# Altium PCB DIO_8SMA_8MCX.PcbDoc (part 9 of 9)
Units mm, origin at the board's own origin, x right, y up, seen from the top; angles counter-clockwise.
Board outline 222.9 x 100 mm, 6 copper layers (TopLayer, L2, L3, L4, L5, Bottom Layer), stack 1.492 mm thick; 542 components, 326 nets, 1968 pads, 1583 vias.
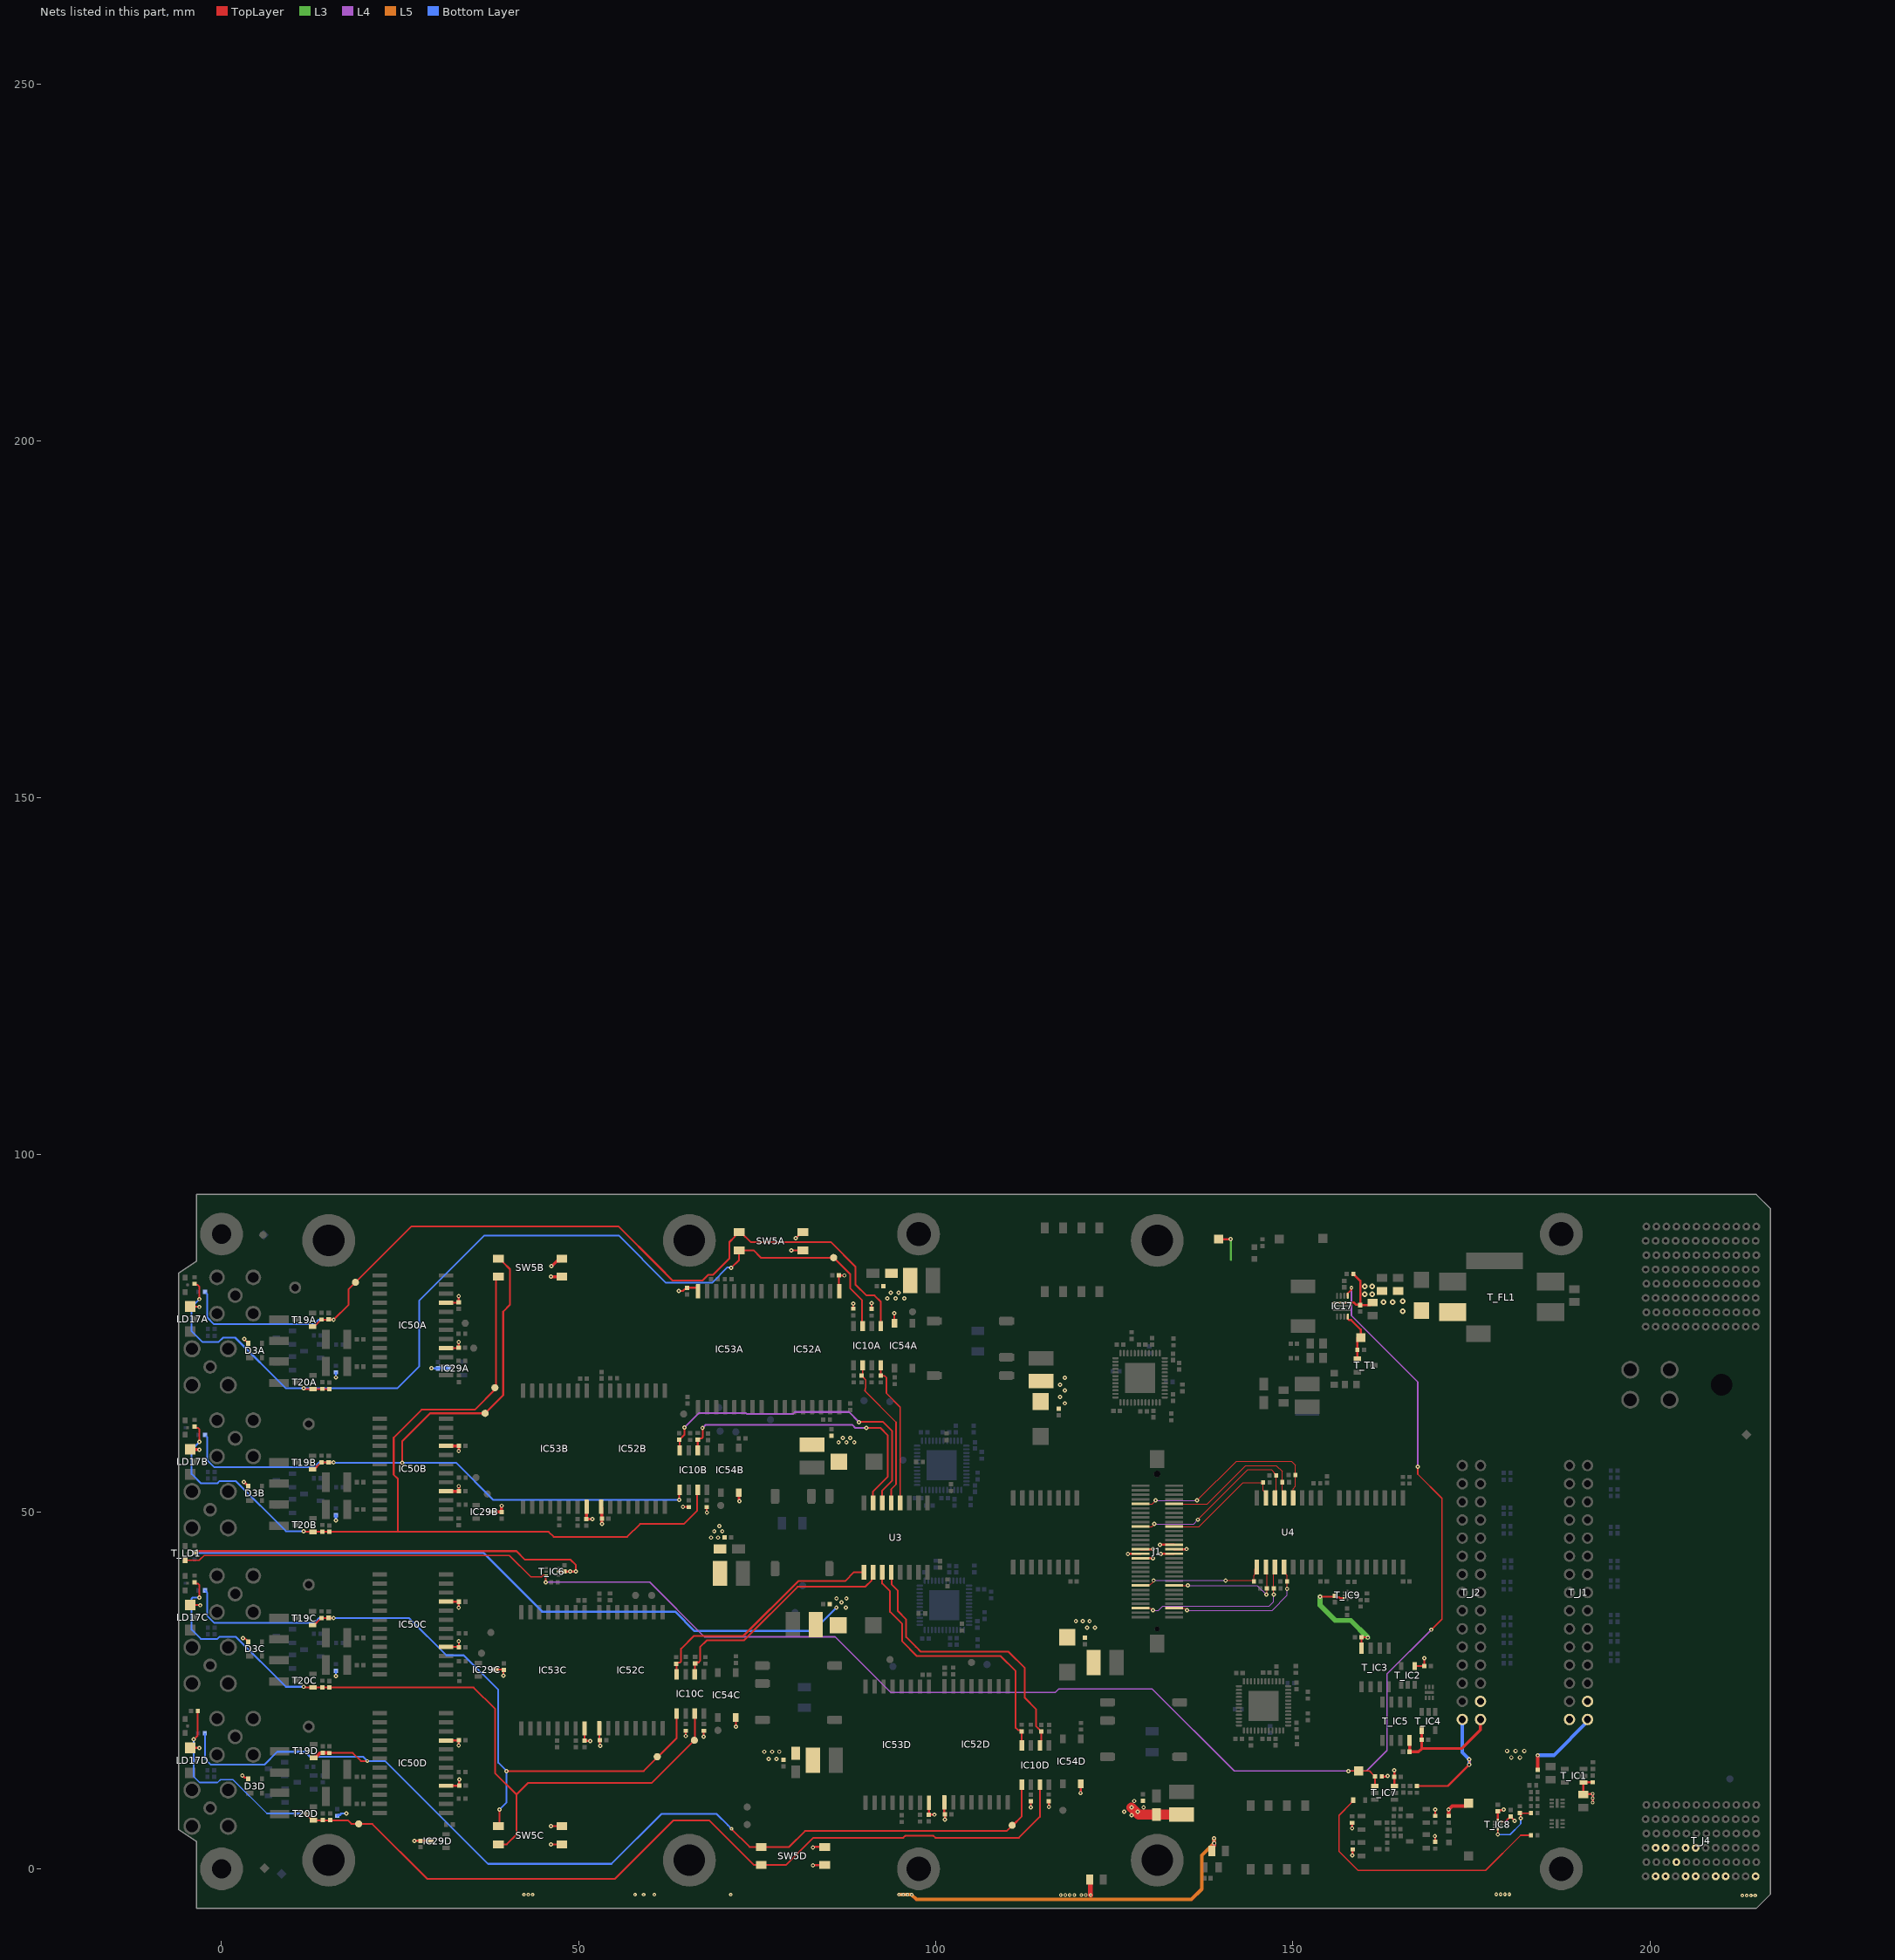
[diagram p12: the nets of this part, all layers, seen from the top]

## Via types
v1: diameter 0.6, hole 0.25, TopLayer to Bottom Layer, tented both sides, 1359 vias
v2: diameter 0.5, hole 0.2, TopLayer to Bottom Layer, tented both sides, 127 vias
v3: diameter 0.6, hole 0.3, TopLayer to Bottom Layer, tented both sides, 45 vias
v4: diameter 0.8, hole 0.3, TopLayer to Bottom Layer, tented both sides, 40 vias
v5: diameter 0.5, hole 0.25, TopLayer to Bottom Layer, tented both sides, 12 vias

## Nets (pads, with @x,y where several pads share a name; then routed paths per layer and width w, separated by ;. In a path a pad name is that pad's centre, name@x,y a point inside that pad or via, vN(x,y) a via of type N, cw(c..) or ccw(c..) an arc to the next point about the centre after c; other vN are vias at no path point) (continued)
P3V3_MP: T_C3.2 T_C4.2 T_C8.2 T_C20.2 T_C22.2 T_C23.2 T_C24.2 T_IC2.4 T_IC3.8 T_IC6.5 T_IC7.6 T_IC8.1 T_IC8.8 T_IC9.8 T_J1.30 T_R1.2 T_R2.2 T_R6.2 T_R8.2 T_R31.2 T_R32.2 T_R33.2 T_R34.2 T_TP3.1 | length 102.4
  TopLayer w0.25: T_R1.2@-3.803,44.307 -3.615,44.495 -3.474,44.495 -3.469,44.5 41.3,44.5 42.5,43.3 48.871,43.3 49.59,42.581 v1(49.59,41.636) ; v1(153.809,38.114) 153.823,38.129 155.754,38.129 T_C24.2@155.875,38.25 156.101,38.024 156.515,38.024 156.638,37.9 T_IC9.8@157.2,37.9 ; T_IC3.8@159.62,30.9 159.62,32.398 T_C4.2@159.607,32.411 160.489,32.411 v5(160.5,32.4) ; T_IC2.4@167.05,28.4 T_C3.2@168.4,28.4 v1(168.4,29.5) ; T_IC8.1@178.7,6.73 T_C22.2@178.7,8.057 178.86,8.217 179.295,8.217 179.396,8.318 v1(179.512,8.318) ; T_IC8.8@179.175,6.6 179.75,6.6 T_C23.2@180.5,7.35 180.66,7.19 180.66,7.141 v1(181.075,6.727)
  TopLayer w0.3: T_IC6.5@47.138,41.6 47.961,41.6 T_C8.2@47.998,41.636 v1(48.794,41.636) v1(49.59,41.636) ; v1(158.3,5.7) T_R34.2@158.3,6.43 ; v1(158.311,1.916) 158.355,1.961 158.355,2.685 T_R33.2@158.4,2.73 ; T_R8.2@162.449,12.923 162.451,12.925 163.144,12.925 163.219,13 v1(163.3,13) ; T_IC7.6@164.2,11.583 164.2,12.888 T_C20.2@164.198,12.89 164.198,13.798 v1(164.2,13.8) ; v1(169.9,4.6) 169.933,4.567 169.933,3.812 T_R32.2@169.955,3.79 ; T_R31.2@169.936,7.436 169.936,8.318 v1(169.942,8.324)
  TopLayer w0.5: T_R6.2@171.833,7.42 171.833,8.24 171.8,8.273 v1(171.8,8.3) 172.306,8.806 174.206,8.806 T_TP3.1@174.6,9.2 ; v1(184.284,15.907) 184.3,15.891 T_R2.2@184.3,13.87
  L3 w0.7: v1(153.809,38.114) 153.809,36.917 155.925,34.8 158.1,34.8 v5(160.5,32.4)
  Bottom Layer w0.5: v1(184.284,15.907) 186.555,15.907 191.27,20.622 T_J1.30@191.27,20.92
P3V3_MP2: T_C5.2 T_C6.2 T_IC4.4 T_IC5.8 T_J2.30 | length 16.8
  TopLayer w0.4: T_IC5.8@166.335,17.975 166.35,17.96 T_C6.2@166.35,16.4 167.6,16.4 168.049,16.849 ; T_C5.2@168.049,18.099 168.049,16.849 ; T_C5.2@168.05,18.1 T_IC4.4@168.05,19.4 ; T_J2.30@176.27,20.92 176.27,19.47 173.649,16.849 168.049,16.849
P5V0_ISO1: C32A.2 C33A.2 C42A.1 C43A.2 C56A.2 C76A.2 C88A.2 D3A.4 IC29A.3 IC50A.16 IC50A.21 IC52A.1 IC53A.16 IC54A.6 L5A.1 LD17A.1 R87A.1 R88A.1 R220A.2 SW5A.1 SW5A.2 | length 21.6
  TopLayer w0.25: LD17A.1@-4.4,78.75 -3.15,78.75 v1(-3.1,78.7) ; v1(3.2,74.2) 3.2,74.15 3.525,73.825 3.575,73.825 3.75,73.65 D3A.4@3.75,73.6 ; IC50A.16@31.45,72.94 33.14,72.94 C33A.2@33.2,73 v1(33.2,73.8) ; IC50A.21@31.45,79.29 33.226,79.29 C32A.2@33.238,79.302 ; C32A.2@33.2,79.35 v1(33.2,80.2) ; v1(63.997,80.926) 64.57,80.926 64.809,81.165 65.015,81.165 65.222,81.372 65.234,81.372 65.254,81.392 IC53A.16@66.714,81.392 ; v1(79.8,86.6) 79.83,86.63 SW5A.1@81.393,86.63 ; v1(80.399,88.319) 80.768,88.688 80.768,88.745 81.193,89.17 SW5A.2@81.393,89.17 ; IC52A.1@86.495,81.392 86.45,81.437 86.45,83.107 86.454,83.104 87.196,83.104 v1(87.2,83.1) ; v1(88.443,79.175) 88.453,79.165 88.453,78.457 R88A.1@88.462,78.448 ; v1(91,79.2) 91.017,79.183 R87A.1@91.017,78.417 ; v1(94.2,77.8) 94.211,77.789 IC54A.6@94.211,76.427
  Bottom Layer w0.25: v1(16,68.813) R220A.2@16,69.53 ; v1(29.4,70.1) 29.409,70.091 C56A.2@30.291,70.091 30.3,70.1 IC29A.3@31.55,70.1
  other v1: 93.2,79.9 94.4,79.9 95.6,79.9 93.7,80.7 94.8,80.7
P5V0_ISO2: C32B.2 C33B.2 C42B.1 C43B.2 C56B.2 C76B.2 C88B.2 D3B.4 IC29B.3 IC50B.16 IC50B.21 IC52B.1 IC53B.16 IC54B.6 L5B.1 LD17B.1 R87B.1 R88B.1 R220B.2 SW5B.1 SW5B.2 | length 20.9
  TopLayer w0.25: v1(64.6,50.7) 65.404,50.7 R87B.1@65.428,50.676 ; v1(67.956,49.916) R88B.1@67.955,50.68
  TopLayer w0.4: LD17B.1@-4.4,58.75 -4.393,58.743 -3.197,58.743 -3.154,58.7 v1(-3.1,58.7) ; v1(3.103,54.2) 3.553,53.75 3.65,53.75 3.75,53.65 D3B.4@3.75,53.6 ; IC50B.16@31.45,52.875 C33B.2@33.246,52.875 ; IC50B.21@31.45,59.225 33.219,59.225 C32B.2@33.225,59.231 ; v1(33.2,53.6) 33.225,53.575 33.225,52.896 C33B.2@33.246,52.875 ; v1(33.2,58.5) 33.225,58.525 C32B.2@33.225,59.231 ; C33B.2@33.25,52.871 C33B.2@33.246,52.875 ; C32B.2@33.25,59.256 C32B.2@33.225,59.231 ; IC29B.3@38.45,50 39.2,50 v1(39.2,50.85) ; v1(46.13,82.93) SW5B.1@47.65,82.93 ; v1(46.2,84.4) 46.92,85.12 47.3,85.12 SW5B.2@47.65,85.47 ; IC53B.16@51.113,50.707 51.113,49.027 C88B.2@51.068,48.982 51.882,48.982 v1(51.9,49) ; IC52B.1@53.155,50.708 53.222,50.641 53.222,49.061 C76B.2@53.25,49.033 53.253,49.029 53.253,48.339 v1(53.257,48.335) ; R88B.1@67.953,50.682 R88B.1@67.955,50.68 ; v1(67.956,49.916) v1(67.956,49.916) ; IC54B.6@72.439,52.68 72.439,51.615 72.5,51.554 v1(72.5,51.5)
  Bottom Layer w0.4: v1(15.996,48.804) 15.998,48.806 15.998,49.528 R220B.2@16,49.53
  other v1: 68.557,46.389 69.505,46.389 68.992,47.28 70.1,47.3 69.7,48
P5V0_ISO3: C32C.2 C33C.2 C42C.1 C43C.2 C56C.2 C76C.2 C88C.2 D3C.4 IC29C.3 IC50C.16 IC50C.21 IC52C.1 IC53C.16 IC54C.6 L5C.1 LD17C.1 R87C.1 R88C.1 R220C.2 SW5C.1 SW5C.2 | length 21.9
  TopLayer w0.25: LD17C.1@-4.4,36.95 -3.025,36.95 v1(-2.995,36.92) ; v1(3,32.31) 3.067,32.243 3.307,32.243 3.525,32.025 3.575,32.025 3.75,31.85 D3C.4@3.75,31.8 ; IC50C.16@31.45,31.075 33.212,31.075 33.258,31.029 33.258,31.842 v1(33.2,31.9) ; IC50C.21@31.45,37.425 31.461,37.414 33.204,37.414 33.204,36.604 v1(33.2,36.6) ; IC29C.3@38.55,27.9 C56C.2@39.4,27.9 ; v1(39.473,27.062) 39.487,27.075 39.487,27.837 C56C.2@39.5,27.85 ; v1(46.1,3.4) SW5C.1@47.92,3.4 ; v1(46.1,6) 46.124,5.976 SW5C.2@48.144,5.976 ; IC53C.16@50.845,19.675 50.8,19.63 C88C.2@50.8,17.95 50.825,17.925 51.575,17.925 v1(51.6,17.9) ; IC52C.1@52.881,19.688 52.881,18.108 C76C.2@52.976,18.013 52.976,17.224 v1(53,17.2) ; v1(65,18.6) R87C.1@65.001,19.336 ; v1(67.5,18.5) 67.526,18.526 R88C.1@67.526,19.343 ; v1(72,19.9) 72.002,19.902 IC54C.6@72.002,21.187
  Bottom Layer w0.25: v1(16,27) R220C.2@16,27.73
  other v1: 76.6,15.4 77.7,15.4 76,16.4 77.1,16.4 78.1,16.4
P5V0_ISO4: C32D.2 C33D.2 C42D.1 C43D.2 C56D.2 C76D.2 C88D.2 D3D.4 IC29D.3 IC50D.16 IC50D.21 IC52D.1 IC53D.16 IC54D.6 L5D.1 LD17D.1 R87D.1 R88D.1 R220D.2 SW5D.1 SW5D.2 | length 29.8
  TopLayer w0.3: LD17D.1@-4.4,16.95 -3.15,16.95 v1(-3.1,16.9) ; v1(2.903,13.063) 2.931,13.063 3.229,12.765 3.6,12.765 3.75,12.615 D3D.4@3.75,12.6 ; v1(27,3.9) 27.028,3.928 C56D.2@27.848,3.928 29.122,3.928 IC29D.3@29.15,3.9 ; IC50D.16@31.447,11.631 33.264,11.631 C33D.2@33.283,11.65 33.283,12.483 v1(33.3,12.5) ; IC50D.21@31.447,17.981 33.175,17.981 C32D.2@33.215,18.021 ; v1(33.2,17.3) 33.215,17.315 C32D.2@33.215,18.021 ; C32D.2@33.229,18.035 C32D.2@33.215,18.021 ; v1(82.8,0.5) 82.83,0.53 SW5D.1@84.45,0.53 ; v1(82.8,3) 82.881,3 82.951,3.07 SW5D.2@84.45,3.07 ; C88D.2@99,7.55 C88D.2@99.045,7.595 ; IC53D.16@99.045,9.275 C88D.2@99.045,7.595 ; v1(99.8,7.6) 99.05,7.6 C88D.2@99.045,7.595 ; IC52D.1@101.205,9.308 101.205,7.728 C76D.2@101.3,7.633 ; v1(101.3,6.9) C76D.2@101.3,7.633 ; v1(113.3,8.6) 113.312,8.612 113.312,9.444 R87D.1@113.325,9.456 ; R88D.1@115.838,9.466 115.845,9.458 v1@115.845,8.687 ; v1(120.3,10.6) 120.32,10.62 IC54D.6@120.32,11.918
  TopLayer w1.4: v1(127.4,8.6) 128.4,7.6 C42D.1@130.9,7.6 L5D.1@134.4,7.6
  Bottom Layer w0.3: R220D.2@16.2,7.43 16.34,7.57 16.57,7.57 16.706,7.706 16.719,7.706 16.767,7.754 v1(17.458,7.754)
  other v1: 127.4,7.5 126.4,8 128.3,8 129.1,8.6 115.845,8.686 127.8,9.5
P12V0: C39A.1 C39B.1 C39C.1 C39D.1 C41A.2 C41B.2 C41C.2 C41D.2 C86.2 C87.2 IC17.1 J1.28 J1.29 J1.30 J1.31 J1.32 J1.33 L11A.2 L11B.2 L11C.2 L11D.2 R68.2 T_C1.2 T_C9.2 T_C10.2 T_D5.1 T_FL1.2 T_IC1.1 T_J1.28 T_J1.29 T_J2.28 T_J2.29 T_J4.A1 T_J4.D1 T_J4.E1 T_J4.G1 T_J4.H1 T_J4.J1 T_J4.K1 T_R3.1 T_R4.1 T_R29.1 T_TP1.1 | length 142
  TopLayer w0.3: v1(126.9,44.1) 126.932,44.133 J1.31@128.65,44.133 ; J1.33@128.65,43.498 130.398,43.498 v1(130.4,43.5) ; J1.29@128.65,44.768 130.368,44.768 v1(130.4,44.8) ; v1(131.4,45.4) 131.402,45.403 J1.28@133.35,45.403 ; v1(131.5,44.1) 131.533,44.133 J1.32@133.35,44.133 ; J1.30@133.35,44.768 135.067,44.768 v1(135.1,44.8) ; T_TP1.1@139.6,88.2 v1(141.3,88.2) ; IC17.1@156.943,79.3 158.557,79.3 158.859,78.999 159.394,78.999 C86.2@159.443,78.95 160.843,78.95 C87.2@161.193,79.3 ; R68.2@158.32,83.202 158.596,83.202 158.596,83.154 158.61,83.14 158.658,83.14 159.443,82.355 159.443,79.3 ; T_R29.1@167.357,11.602 171.702,11.602 v3(174.682,14.582) 174.717,14.617 174.717,15.312 v1(174.683,15.346) ; v5(192,9.3) v5(192,9.9) 192,10.488 v5(191.998,10.49) 190.79,10.49 T_C1.2@190.7,10.4 190.698,10.402 T_IC1.1@190.698,12.082 190.746,12.13 T_R4.1@192,12.13
  L3 w0.3: 141.3,85.28 v1(141.3,88.2)
  Bottom Layer w0.3: T_R3.1@-3.78,44.27 36.63,44.27 44.883,36.017 63.517,36.017 66.234,33.3 82.807,33.3 v1(86.095,36.588)
  Bottom Layer w0.5: T_J2.29@173.73,20.92 173.73,16.299 v1(174.683,15.346) 174.683,14.583 v3(174.682,14.582)
  other v1: 121.2,33.8 122.289,33.797 119.629,34.681 120.6,34.681 121.532,34.694 87.4,36.6 86.8,37.3 86.1,37.873 87.5,37.873 86.4,59.745 87.5,59.745 88.6,59.745 86.988,60.331 88,60.355 118.1,65.2 117.4,66.1 118.1,67 117.4,67.8 118.1,68.8
  other v3: 180.6,15.6 181.8,15.6 180,16.5 181.2,16.5 182.4,16.5
  other v4: 165.4,78.1 162.7,79.4 164,79.4 165.4,79.5 160.067,80.5 161.1,80.5 160.064,81.569 161.107,81.592
PGOOD: IC17.7 R1.1 T_T1.1 T_TP4.1 | length 6.8
  TopLayer w0.3: IC17.7@157.693,77.35 157.693,77.026 157.869,76.85 158.172,76.85 159.5,75.522 T_TP4.1@159.5,74.4 ; R1.1@159.03,72.7 T_TP4.1@159.03,74.4 ; T_T1.1@159.05,71.45 R1.1@159.05,72.68
PSU_EN: IC17.8 T_IC6.3 T_IC7.1 T_LD1.1 T_R8.1 T_TP8.1 | length 263.5
  TopLayer w0.2: T_LD1.1@-5.1,43.2 -3.143,43.2 -2.443,43.9 40.3,43.9 43.3,40.9 44.8,40.9 45,41.1 T_IC6.3@45.43,41.1 ; v1(45.38,40.153) 45.38,41.05 T_IC6.3@45.43,41.1 ; T_IC6.3@45.426,41.064 T_IC6.3@45.462,41.1 T_IC6.3@45.43,41.1 ; v1(157.8,13.7) 159.1,13.7 T_TP8.1@159.15,13.65 ; T_TP8.1@159.2,13.7 160.732,13.7 161.299,13.133 161.319,13.133 161.509,12.943 T_R8.1@161.509,12.923 161.5,12.914 T_IC7.1@161.5,11.583 ; v1(167.5,56.3) 167.5,55.284 170.886,51.899 170.886,34.986 v1(169.4,33.5)
  TopLayer w0.3: IC17.8@157.693,80.25 157.693,80.6 158.177,81.084 158.177,81.351 v2(158.215,81.39)
  L4 w0.2: v1(45.38,40.153) 59.947,40.153 67.6,32.5 85.9,32.5 93.703,24.697 116.728,24.697 117.231,25.2 130.3,25.2 141.8,13.7 v1(157.8,13.7) 160.3,13.7 163.2,16.6 163.2,27.3 v1(169.4,33.5) ; v2(158.215,81.39) 158.215,77.471 167.5,68.186 v1(167.5,56.3)
RSTn: T_D6.1 T_R15.1 | length 38
  TopLayer w0.2: T_D6.1@158.45,9.6 158.236,9.386 158.236,9.286 156.45,7.5 156.45,2.45 159.12,-0.22 176.98,-0.22 181.9,4.7 182.47,4.7 T_R15.1@183.33,4.7
SB_0: T_J4.I2
SB_1: T_J4.G3
SB_2: T_J4.H3
SB_3: T_J4.J3
SB_4: T_J4.K3
SERVMOD_3V3: T_IC8.5 T_R17.1 T_R19.2 | length 7.7
  TopLayer w0.2: v1(178.7,4.8) T_IC8.5@178.7,5.62 ; T_R19.2@181.8,7.8 T_R17.1@183.33,7.8 ; T_R19.2@181.8,7.83 181.9,7.73 v1(181.9,7.1)
  Bottom Layer w0.2: v1(178.7,4.8) 180.4,4.8 181.9,6.3 v1(181.9,7.1)
STRIP2: T_R27.1 | length 53
  TopLayer w0.5: T_R27.1@138.65,2.5 138.9,2.75 138.9,3.168 139,3.268 139,3.6 v3@138.991,3.609 ; v3@138.968,3.605 v1@138.968,4.281
  L5 w0.5: v2@94.843,-3.628 v2@96.609,-3.628 ; v2@96.643,-3.65 97.294,-4.301 135.792,-4.301 137.25,-2.843 137.25,1.878 v3(138.972,3.6) v3@138.972,3.627 ; v3@138.978,3.633 v1@138.978,4.245
  other v1: 138.956,4.293
  other v2: 42.343,-3.619 42.943,-3.619 43.543,-3.619 57.9,-3.619 59.1,-3.619 60.601,-3.619 71.3,-3.619 94.843,-3.619 95.441,-3.619 96.043,-3.619 96.643,-3.619
STRIP3: T_R28.1 | length 2.2
  TopLayer w0.7: T_R28.1@121.643,-1.55 121.643,-3.623 v2(121.701,-3.681)
  other v2: 212.943,-3.75 213.543,-3.75 214.143,-3.75 214.743,-3.75 117.514,-3.661 118.143,-3.661 118.762,-3.661 119.4,-3.661 120.382,-3.661 121.004,-3.661 178.495,-3.57 179.095,-3.57 179.695,-3.57 180.295,-3.57
TERM_CH_1: IC10A.4 R17.1 U3.4 | length 20.7
  TopLayer w0.2: IC10A.4@92.299,70.517 92.299,69.071 R17.1@92.3,69.07 92.83,69.07 93.1,68.8 93.1,66.6 95.035,64.665 U3.4@95.035,51.25
TERM_CH_2: IC10A.2 R18.1 U3.5 | length 21.7
  TopLayer w0.2: IC10A.2@89.759,70.517 89.759,69.229 R18.1@89.6,69.07 89.62,69.07 89.81,68.88 89.81,68.86 90.2,68.47 90.2,67.4 90.12,67.32 90.12,67.085 90.1,67.065 90.1,66.9 94.445,62.555 94.445,53.845 93.765,53.165 U3.5@93.765,51.25
TERM_CH_3: IC10B.4 R19.1 U3.6 | length 45.5
  TopLayer w0.25: IC10B.4@64.148,58.602 64.148,60.042 R19.1@64.098,60.091 64.118,60.091 64.283,60.256 64.283,60.276 64.503,60.496 64.51,60.496 64.807,60.794 64.807,61.793 v1(64.8,61.8) ; v1(89.237,62.555) 89.303,62.622 89.544,62.622 89.558,62.636 92.564,62.636 93.909,61.291 93.909,54.396 92.495,52.982 U3.6@92.495,51.25
  L4 w0.25: v1(64.8,61.8) 66.845,63.845 73.402,63.845 73.555,63.691 79.985,63.691 80.278,63.985 87.86,63.985 89.237,62.609 v1(89.237,62.555)
TERM_CH_4: IC10B.2 R20.1 U3.7 | length 40.8
  TopLayer w0.25: R20.1@66.677,60.104 66.842,60.269 67.222,60.269 67.368,60.415 67.368,61.717 v1@67.3,61.785 ; v1(90.267,61.755) 92.25,61.755 93.266,60.739 93.266,54.901 91.225,52.86 U3.7@91.225,51.25
  TopLayer w0.3: R20.1@66.677,60.104 66.688,60.092 IC10B.2@66.688,58.602
  L4 w0.25: v1(67.344,61.741) 67.802,62.2 88.3,62.2 88.745,61.755 v1(90.267,61.755)
TERM_CH_5: IC10C.4 R21.1 U3.9 | length 34.1
  TopLayer w0.25: IC10C.4@63.721,27.263 63.721,28.666 R21.1@63.676,28.71 63.841,28.875 64.187,28.875 64.333,29.022 64.333,30.833 66.112,32.612 73.062,32.612 80.75,40.3 87.3,40.3 88.55,41.55 U3.9@89.955,41.55
TERM_CH_6: IC10C.2 R22.1 U3.10 | length 33.1
  TopLayer w0.25: IC10C.2@66.261,27.263 66.261,28.708 66.474,28.921 66.804,28.921 67,29.118 67,31.048 67.96,32.008 73.149,32.008 80.64,39.5 90.1,39.5 91.025,40.425 91.025,40.991 U3.10@91.3,41.266
TERM_CH_7: IC10D.4 R23.1 U3.11 | length 38.9
  TopLayer w0.25: U3.11@92.495,41.55 92.495,39.977 93.6,38.872 93.6,36 95.303,34.297 95.303,31.87 97.373,29.8 109.1,29.8 111.2,27.7 111.2,19.751 111.552,19.399 111.886,19.399 R23.1@112.051,19.234 112.051,17.789 IC10D.4@112.045,17.782
TERM_CH_8: IC10D.2 R24.1 U3.12 | length 39.8
  TopLayer w0.25: U3.12@93.765,41.55 93.8,41.515 93.8,39.858 94.7,38.958 94.7,36.1 95.869,34.931 95.869,32.454 97.212,31.112 97.907,30.416 110.184,30.416 112.476,28.124 112.476,23.938 114.065,22.349 114.065,19.959 114.389,19.635 114.395,19.635 114.615,19.415 114.615,19.395 114.78,19.23 R24.1@114.8,19.23 114.8,18.529 114.785,18.514 114.785,17.982 IC10D.2@114.585,17.782
TERM_CH_9: J1.9 R89.1 U4.4 | length 29.1
  TopLayer w0.15: J1.9@128.65,51.118 130.317,51.118 v1(130.8,51.6) ; v1(136.559,51.619) 136.619,51.619 142.1,57.1 149.8,57.1 150.365,56.535 R89.1@150.365,55.152 150.365,53.582 150.035,53.251 U4.4@150.035,51.95
  L4 w0.15: v1(130.8,51.6) 136.54,51.6 v1(136.559,51.619)
TERM_CH_10: J1.10 R90.1 U4.5 | length 21.6
  TopLayer w0.15: J1.10@133.35,51.118 138.018,51.118 143.4,56.5 147.7,56.5 148.525,55.675 R90.1@148.525,54.152 148.525,52.19 U4.5@148.765,51.95
TERM_CH_11: J1.19 R91.1 U4.6 | length 26
  TopLayer w0.15: J1.19@128.65,47.943 130.243,47.943 v1(130.6,48.3) ; v1(136.7,48.9) 143.7,55.9 147.015,55.9 147.455,55.46 147.455,55.315 R91.1@147.67,55.1 147.67,52.125 U4.6@147.495,51.95
  L4 w0.15: v1(130.6,48.3) 136.1,48.3 v1(136.7,48.9)
TERM_CH_12: J1.20 R92.1 U4.7 | length 17.4
  TopLayer w0.15: J1.20@133.35,47.943 136.843,47.943 143,54.1 R92.1@145.83,54.1 145.83,53.013 145.918,52.925 145.975,52.925 146.225,52.675 U4.7@146.225,51.95
TERM_CH_13: J1.45 R93.1 U4.9 | length 18.5
  TopLayer w0.15: J1.45@128.65,39.688 128.736,39.773 130.007,39.773 130.423,40.189 130.423,40.316 v1(130.509,40.402) ; v1(140.584,40.389) 144.409,40.389 R93.1@144.564,40.234 144.564,41.095 144.705,41.236 144.705,42 U4.9@144.955,42.25
  L4 w0.15: v1(130.509,40.402) 130.525,40.386 131.365,40.386 131.368,40.389 v1(140.584,40.389)
TERM_CH_14: J1.46 R94.1 U4.10 | length 17.4
  TopLayer w0.15: J1.46@133.35,39.688 135.288,39.688 v1(135.3,39.7) ; U4.10@146.225,42.25 146.37,42.105 R94.1@146.37,39.3 v1@146.37,38.4
  L4 w0.15: v1(135.3,39.7) 145,39.7 v1(146.3,38.4)
TERM_CH_15: J1.55 R95.1 U4.11 | length 24.2
  TopLayer w0.15: J1.55@128.65,36.513 130.088,36.513 v1(130.4,36.2) ; v1(147.326,38.409) 147.33,38.413 147.33,42.085 U4.11@147.495,42.25
  L4 w0.15: v1(130.4,36.2) 131.2,36.2 131.794,36.794 146.694,36.794 147.326,37.426 v1(147.326,38.409)
TERM_CH_16: J1.56 R96.1 U4.12 | length 21
  TopLayer w0.15: J1.56@133.35,36.513 134.888,36.513 v1(135.2,36.2) ; U4.12@148.765,42.25 148.765,41.525 149.204,41.086 R96.1@149.204,40.234 149.204,39.204 v1(149.2,39.2)
  L4 w0.15: v1(135.2,36.2) 147.1,36.2 149.2,38.3 v1(149.2,39.2)
TERM_IO0A: B11A.1 C95A.2 IC10A.5 R212A.1 R219A.1 SW5A.3 T19A.1 | length 124.2
  TopLayer w0.25: T19A.1@12.95,75.95 R219A.1@13.765,76.765 ; R219A.1@14,76.93 C95A.2@14.98,76.93 ; C95A.2@15.069,76.931 15.656,76.931 v1(15.675,76.912) ; v1@15.687,76.9 17.8,79.013 17.8,81.2 B11A.1@18.743,82.143 26.6,90 55.555,90 61.144,84.41 63.155,82.4 67.345,82.4 68.141,83.197 68.797,83.197 71.1,85.5 71.1,87.777 71.868,88.545 71.868,88.745 72.293,89.17 SW5A.3@72.493,89.17 72.693,89.17 74.111,87.752 85.348,87.752 88.747,84.353 88.747,81.853 90.3,80.3 91.427,80.3 92.299,79.428 IC10A.5@92.299,76.017
  Bottom Layer w0.25: R212A.1@-2.145,80.615 -1.985,80.455 -1.985,77.202 -1.052,76.269 12.969,76.269 13.612,76.912 v1(15.675,76.912)
TERM_IO0B: B11B.1 C95B.2 IC10B.5 R212B.1 R219B.1 SW5B.3 T19B.1 | length 116.6
  TopLayer w0.25: T19B.1@12.95,55.95 R219B.1@13.765,56.765 ; R219B.1@14,56.93 C95B.2@14.98,56.93 ; C95B.2@15.069,56.931 15.656,56.931 v1(15.675,56.912) ; v1(25.299,56.879) 25.286,56.892 25.286,59.886 29.2,63.8 B11B.1@36.9,63.8 39.432,66.332 39.432,78.041 40.384,78.993 40.384,83.984 39.375,84.992 39.375,85.045 38.95,85.47 SW5B.3@38.75,85.47 ; v1(64.1,51.7) IC10B.5@64.1,53.057
  Bottom Layer w0.25: R212B.1@-2.145,60.615 -1.985,60.455 -1.985,57.202 -1.052,56.269 12.969,56.269 13.612,56.912 v1(15.675,56.912) 15.695,56.892 25.286,56.892 v1(25.299,56.879) 32.821,56.879 38,51.7 v1(64.1,51.7)
TERM_IO0C: B11C.1 C95C.2 IC10C.5 R212C.1 R219C.1 SW5C.3 T19C.1 | length 102.1
  TopLayer w0.25: T19C.1@12.75,34.15 12.95,34.15 13.765,34.965 13.835,34.965 R219C.1@14,35.13 14.98,35.13 C95C.2@15,35.15 ; R219C.1@13.8,35.2 R219C.1@13.93,35.2 ; C95C.2@15,35.2 15.069,35.131 15.656,35.131 v1(15.675,35.112) ; v1(38.9,8.3) 38.9,6.32 SW5C.3@39.25,5.97 ; v1(39.9,13.7) 59.1,13.7 63.721,18.321 IC10C.5@63.721,21.763
  Bottom Layer w0.25: R212C.1@-2.33,39 -2.33,38.98 -2.165,38.815 -2.145,38.815 -1.985,38.655 -1.985,35.402 -1.052,34.469 12.969,34.469 13.612,35.112 v1(15.675,35.112) 26.264,35.112 31.477,29.9 33.9,29.9 38.741,25.059 38.741,14.859 v1(39.9,13.7) 39.9,9.3 v1(38.9,8.3)
TERM_IO0D: B11D.1 C95D.2 IC10D.5 R212D.1 R219D.1 SW5D.3 T19D.1 | length 145.2
  TopLayer w0.25: R219D.1@15.107,16.221 18.379,16.221 19.5,15.1 v2(20.4,15.1) ; v2(71.4,5.6) 73.93,3.07 SW5D.3@75.55,3.07 79.47,3.07 81.7,5.3 109.9,5.3 B11D.1@110.7,6.1 ; B11D.1@110.75,6.05 112.045,7.345 IC10D.5@112.045,11.782 IC10D.5@112.045,12.282
  TopLayer w0.5: T19D.1@12.95,15.55 13.025,15.625 13.176,15.625 13.733,16.182 14.127,16.182 C95D.2@14.187,16.242 14.204,16.26 R219D.1@15.084,16.26
  Bottom Layer w0.25: R212D.1@-2.3,18.959 -2.3,15.4 -1.488,14.588 5.988,14.588 7.8,16.4 11.7,16.4 12.4,15.7 19.8,15.7 v2(20.4,15.1) 22.9,15.1 37.3,0.7 54.6,0.7 61.6,7.7 69.3,7.7 70.887,6.113 v2(71.4,5.6)
TERM_IO1A: B12A.1 C100A.2 IC10A.7 R213A.1 R218A.1 SW5A.4 T20A.1 | length 135.4
  TopLayer w0.25: R213A.1@-3.635,81.765 -3.348,81.765 -3.1,81.517 v1@-3.1,79.821 ; v1@11.694,67.2 T20A.1@12.783,67.2 C100A.2@15.1,67.2 ; v1(71.371,84.189) 72.443,85.261 72.443,86.58 SW5A.4@72.493,86.63 74.47,86.63 75.5,85.6 B12A.1@85.7,85.6 88.051,83.249 88.051,81.279 89.7,79.63 IC10A.7@89.7,76.368
  Bottom Layer w0.25: v1(-3.1,79.8) -4.2,78.7 -4.2,75.3 -2.7,73.8 -0.4,73.8 0.2,74.4 1.9,74.4 9,67.3 v1(11.5,67.3) 24.6,67.3 27.7,70.4 27.7,79.6 36.8,88.7 55.6,88.7 62.222,82.078 68.672,82.078 70.85,84.256 71.057,84.256 ; 71.057,84.256 71.304,84.256 v1(71.371,84.189)
TERM_IO1B: B12B.1 C100B.2 IC10B.7 R213B.1 R218B.1 SW5B.4 T20B.1 | length 132.6
  TopLayer w0.25: R213B.1@-3.635,61.765 -3.348,61.765 -3.1,61.517 v1@-3.1,59.821 ; v1@11.694,47.2 T20B.1@12.783,47.2 15.1,47.2 C100B.2@15.1,47.196 ; C100B.2@15.093,47.196 C100B.2@15.1,47.196 ; SW5B.4@38.75,82.93 38.4,82.58 38.4,67.254 35.446,64.3 28,64.3 24.1,60.4 24.1,55.2 24.697,54.603 24.697,47.198 ; IC10B.7@66.688,53.102 66.6,53.014 66.6,50.195 64.71,48.305 58.594,48.305 56.789,46.5 46.5,46.5 45.802,47.198 24.697,47.198 ; C100B.2@15.1,47.196 24.695,47.196 24.697,47.198
  Bottom Layer w0.25: v1(-3.1,59.8) -4.2,58.7 -4.2,55.3 -2.9,54 -0.6,54 -0.315,54.285 2.015,54.285 9,47.3 v1(11.5,47.3)
TERM_IO1C: B12C.1 C100C.2 IC10C.7 R213C.1 R218C.1 SW5C.4 T20C.1 | length 108.5
  TopLayer w0.25: R213C.1@-3.8,40.13 -3.635,39.965 -3.348,39.965 -3.1,39.717 v1@-3.1,38.021 ; v1(11.5,25.5) 11.595,25.5 11.694,25.4 T20C.1@12.783,25.4 14.099,25.4 15.093,25.4 35.3,25.4 38.275,22.425 38.275,13.425 41.3,10.4 ; SW5C.4@39.25,3.43 39.93,3.43 41.3,4.8 41.3,10.4 ; B12C.1@66.2,18 60.244,12.044 42.944,12.044 41.3,10.4 ; B12C.1@66.261,18.161 IC10C.7@66.261,21.763
  Bottom Layer w0.25: v1(-3.1,38) -4.054,38 -4.2,37.854 -4.2,33.5 -2.9,32.2 -0.6,32.2 -0.315,32.485 2.015,32.485 9,25.5 v1(11.5,25.5)
TERM_IO1D: B12D.1 C100D.2 IC10D.7 R213D.1 R218D.1 SW5D.4 T20D.1 | length 147.7
  TopLayer w0.25: v1(-3.9,18.12) -3.33,18.69 R213D.1@-3.33,22.1 ; v1(11.733,7.75) 12.683,6.8 T20D.1@12.883,6.8 17.671,6.8 18.171,6.3 B12D.1@19.2,6.3 ; B12D.1@19.2,6.277 21.123,6.277 28.8,-1.4 55.087,-1.4 63.287,6.8 68.276,6.8 74.546,0.53 SW5D.4@75.55,0.53 79.03,0.53 82.843,4.343 95.443,4.343 95.725,4.625 99.675,4.625 99.957,4.343 111.643,4.343 114.585,7.285 IC10D.7@114.585,11.782
  Bottom Layer w0.2: v1@-3.9,18.1 -3.9,12.9 -3.1,12.1 -0.556,12.1 -0.156,12.5 1.6,12.5 6.35,7.75
  Bottom Layer w0.25: 6.35,7.75 v1(11.733,7.75)
pads on no net: FTG1.1 FTG2.1 FTG3.1 FTG4.1 FTG5.1 FTG6.1 IC1A.8 IC1B.8 IC1C.8 IC1D.8 IC3.17 IC3.44 IC12A.8 IC12B.8 IC12C.8 IC12D.8 IC13.17 IC13.44 IC32.17 IC32.44 IC46.17 IC46.44 IC50A.1 IC50A.3 IC50A.4 IC50A.6 IC50A.19 IC50A.20 IC50A.22 IC50A.23 IC50B.1 IC50B.3 IC50B.4 IC50B.6 IC50B.19 IC50B.20 IC50B.22 IC50B.23 IC50C.1 IC50C.3 IC50C.4 IC50C.6 IC50C.19 IC50C.20 IC50C.22 IC50C.23 IC50D.1 IC50D.3 IC50D.4 IC50D.6 IC50D.19 IC50D.20 IC50D.22 IC50D.23 IC52A.3 IC52A.4 IC52A.7 IC52A.10 IC52A.14 IC52B.3 IC52B.4 IC52B.7 IC52B.10 IC52B.14 IC52C.3 IC52C.4 IC52C.7 IC52C.10 IC52C.14 IC52D.3 IC52D.4 IC52D.7 IC52D.10 IC52D.14 IC53A.3 IC53A.4 IC53A.7 IC53A.10 IC53A.14 IC53B.3 IC53B.4 IC53B.7 IC53B.10 IC53B.14 IC53C.3 IC53C.4 IC53C.7 IC53C.10 IC53C.14 IC53D.3 IC53D.4 IC53D.7 IC53D.10 IC53D.14 J1. J1.MECH1 J1.MECH2 LD15A.3 LD15B.3 LD15C.3 LD15D.3 LD16A.3 LD16B.3 LD16C.3 LD16D.3 T_D1.5 T_D2.5 T_D3.5 T_IC1.4 T_IC2.5 T_IC3.7 T_IC4.5 T_IC5.7 T_J4.B1 T_J4.L2 T_J5.A3 T_J5.A5 T_J5.A7 T_J5.A8 T_J5.B2 T_J5.B3 T_J5.B4 T_J5.B5 T_J5.B6 T_J5.B7 T_J5.B8 T_J5.C2 T_J5.C4 T_J5.C6 T_J5.C8 T_J5.D3 T_J5.D5 T_J5.D7 T_J5.D8 T_J5.E2 T_J5.E3 T_J5.E4 T_J5.E5 T_J5.E6 T_J5.E7 T_J5.E8 T_J5.F2 T_J5.F4 T_J5.F6 T_J5.F8 T_J5.G3 T_J5.G5 T_J5.G7 T_J5.H2 T_J5.H3 T_J5.H4 T_J5.H5 T_J5.H6 T_J5.H7 T_J5.H8 T_J5.I2 T_J5.I4 T_J5.I6 T_J5.I8 T_J5.J3 T_J5.J5 T_J5.J7 T_J5.K2 T_J5.K3 T_J5.K4 T_J5.K5 T_J5.K6 T_J5.K7 T_J5.K8 T_J5.L2 T_J5.L4 T_J5.L6 T_J5.L8 T_J6.5 T_LD1.3 T_LD2.3 U1.13 U2.13 U3.13 U4.13

## Polygon pours and split planes (outlines as drawn)
P5V0_ISO4 on TopLayer "P5V0_ISO4" (solid, pour order 262): 130,10.028 127.381,10.028 126.021,8.668 126.021,7.227 126.548,6.7 130,6.7
CHASSIS on TopLayer "esd1_direct" (solid, pour order 357): 1.2,3.2 cw(c1.2,1.4) 3,1.4 3,-2.073 ccw(c4.316,-2.073) 4.022,-3.356 13.344,-3.356 13.8,-2.9 13.8,-2 16.2,-2 16.211,-2.777 16.789,-3.356 36.6,-3.356 36.6,-4.65 -3.2,-4.65 -3.2,3.2
STRIP3 on TopLayer "STRIP3_L01_P378" (solid, pour order 378): 214.885,-4.645 216.063,-3.467 116.932,-3.467 116.932,-4.645
STRIP2 on TopLayer "esd1" (solid, pour order 377): 96.932,-4.651 96.932,-3.363 41.932,-3.363 41.932,-4.651
NetIC1D_2 on TopLayer "NONET_L03_P-001" (solid, pour order 402): 126.534,24.456 124.256,26.734 124.256,31.056 124.756,31.556 127.256,31.556 129.656,29.156 129.656,21.156 128.756,20.256 127.902,19.402 122.82,19.38 122.6,19.6 122.6,21.6 122.9,21.9 126.2,21.9 126.556,22.256
NetIC1C_2 on TopLayer "NONET_L03_P-001" (solid, pour order 404): 74.5,27.2 74.2,26.9 74.2,25 74.7,24.5 78.3,24.5 81.4,27.6 81.4,36.4 81,36.8 78.8,36.8 78.1,36.1 78.1,28.1 77.2,27.2
P12V0 on TopLayer "NONET_L03_P-001" (solid, pour order 390): 88.45,36.25 88.45,32.75 87.7,32 81.8,32 81.6,32.2 81.6,36.2 82,36.6 84.6,36.6 84.7,36.7 84.7,37.8 85.5,38.6 87.9,38.6 88.45,38.05
P12V0 on TopLayer "NONET_L03_P-001" (solid, pour order 403): 88.338,61.438 81.138,61.438 80.4,60.7 80.4,58 80.712,57.688 81.925,57.725 81.95,57.7 83.85,57.7 84.35,57.2 84.35,56.2 85.35,55.2 87.85,55.2 89.056,56.406 89.056,57.75 89.005,60.77
P12V0 on TopLayer "NONET_L03_P-001" (solid, pour order 388): 119.3,30.3 120.4,29.2 120.4,27 121.1,26.3 123.2,26.3 123.6,26.7 123.6,31.8 124.7,32.9 124.7,33.8 123.2,35.3 117.8,35.3 116.5,34.014 116.5,31.44 117.64,30.3
GND on TopLayer "TopLayer-GND" (solid, remove dead copper, pour order 356): 61 vertices, not listed, extent 144.243,66.35 183.643,90.85
P12V0 on TopLayer "NONET_L03_P-001" (solid, pour order 283): 189.9,11.6 189.4,11.1 189.4,9.6 189.7,9.3 191.4,9.3 191.7,9 192.7,9 192.8,9.1 192.8,11.1 192.3,11.6
NetIC1A_2 on TopLayer "NONET_L03_P-001" (solid, pour order 392): 108.227,72.427 108.227,70.597 108.627,70.197 116.827,70.197 117.527,70.897 117.527,72.497 116.927,73.097 108.897,73.097
NetIC1B_2 on TopLayer "NONET_L03_P-001" (solid, pour order 409): 81.2,52.033 81.2,51.1 81.6,50.7 83.4,50.7 83.9,51.2 83.9,53.8 85,54.9 85,57.3 84.7,57.6 80.4,57.6 80.1,57.3 80.1,54.6 81.2,53.5
P5V0_ISO1 on TopLayer "P5V0_ISO1" (solid, pour order 248): 92.5,79.933 92.933,79.5 97,79.5 97.522,79.978 97.8,80.257 97.8,84.451 97.597,84.654 95.197,84.654 93.154,84.654 92.1,83.6 92.1,80.323
P5V0_ISO2 on TopLayer "P5V0_ISO2" (solid, pour order 249): 70.5,48.1 70.9,47.7 70.9,39.5 70.4,39 68.7,39 68.2,39.5 68.2,47.3 69.4,48.5 70.1,48.5
NetIC1B_5 on TopLayer "NONET_L03_P-001" (solid, pour order 406): 78.6,40.8 78.1,40.3 77.6,40.3 76.3,39 72.1,39 71.5,39.6 71.5,43.2 72,43.7 78.3,43.7 78.6,43.4
NetIC1A_5 on TopLayer "NONET_L03_P-001" (solid, pour order 387): 98,84.3 98.4,84.7 101,84.7 101.3,84.4 101.3,75.9 101,75.6 98.5,75.6 98,76.1
P5V0_ISO3 on TopLayer "P5V0_ISO3" (solid, pour order 258): 20 vertices, not listed, extent 75.4,13 84.4,17.8
NetIC1C_5 on TopLayer "NONET_L03_P-001" (solid, pour order 385): 84.3,17.6 84.5,17.4 84.5,13.1 84.6,13 84.8,12.8 87.4,12.8 87.8,13.2 87.8,21.7 87.5,22 84.7,22 84.3,21.6
P12V0 on TopLayer "NONET_L03_P-001" (solid, pour order 391): 117.8,63.8 118.8,64.8 118.8,69 118.1,69.7 112.7,69.7 112.4,69.437 112.4,64.7 113.3,63.8
NetIC17_2 on TopLayer "NETIC17_2_L01_P342" (solid, remove dead copper, pour order 342): 149.6,82.9 153,82.9 153.6,82.3 153.6,80.793 155.543,78.85 155.343,78.65 154.55,78.65 152.8,80.4 149.6,80.4 149.4,80.6 149.4,82.7
P12V0 on TopLayer "TopLayer-P12V0" (solid, remove dead copper, pour order 352): 19 vertices, not listed, extent 155.543,76.55 174.3,82.05
NetT_C11_2 on TopLayer "NETT_C11_2_L01_P316" (solid, remove dead copper, pour order 316): 184.888,80.158 194.888,80.158 195.388,79.658 195.388,76.058 194.888,75.558 184.488,75.558 184.088,75.958 184.088,79.358
P3V3 on TopLayer "P3V3_L01_P344" (solid, remove dead copper, pour order 344): 145.3,66.35 144.7,65.75 144.7,62 145.361,61.339 152.343,61.35 154.243,63.25 154.243,66.15 153.843,66.55 150.243,66.55 149.743,66.05 147.043,66.05 146.743,66.35
3V3 on TopLayer "3V3_L01_P343" (solid, remove dead copper, pour order 343): 17 vertices, not listed, extent 149.4,67.25 154.243,77.2
NetT_C11_1 on TopLayer "NETT_C11_1_L01_P318" (solid, remove dead copper, pour order 318): 184.721,80.396 194.721,80.396 195.221,80.896 195.221,84.496 194.721,84.996 184.321,84.996 183.921,84.596 183.921,81.196
CHASSIS on Bottom Layer "esd1" (solid, pour order 415): 1.2,3.2 cw(c1.2,1.4) 3,1.4 3,-2.073 ccw(c4.316,-2.073) 4.022,-3.356 13.344,-3.356 16.789,-3.356 36.6,-3.356 36.6,-4.65 -3.2,-4.65 -3.2,3.2
STRIP2 on Bottom Layer "esd1" (solid, pour order 237): 80.001,-4.55 97.068,-4.55 97.068,-3.281 41.443,-3.281 41.443,-4.55
STRIP3 on Bottom Layer "STRIP3_L06_P234" (solid, pour order 234): 214.601,-4.55 214.618,-4.55 215.858,-3.31 117.068,-3.31 117.068,-4.55
P3V3 on Bottom Layer "NONET_L03_P-001" (solid, pour order 411): 144.9,62.1 145.3,61.7 152.7,61.7 154.4,63.4 154.4,64.9 154,65.3 147.2,65.3 144.9,63
3V3 on Bottom Layer "NONET_L03_P-001" (solid, pour order 410): 149.8,67.5 150,67.3 154,67.3 154.2,67.5 154.2,69.8 153.6,70.4 150.2,70.4 149.8,70
GND on Bottom Layer "GND_L06_P348" (solid, remove dead copper, pour order 348): 202.903,46.2 202.903,42.7 216.903,42.7 216.903,46.2
NetT_C11_1 on Bottom Layer "NETT_C11_1_L06_P176" (solid, pour order 176): 19 vertices, not listed, extent 190.2,63.6 205.35,84.8
NetT_C11_2 on Bottom Layer "NETT_C11_2_L06_P175" (solid, pour order 175): 195.35,74.2 195.35,77.95 194.4,78.9 190.9,78.9 190.2,78.2 190.2,73.338 190.876,72.476 193.951,69.401 193.95,65.2 195.35,63.8 197.95,63.8 199.65,65.5 199.65,69.9
GND on L4 "MidLayer1-GND" (solid, remove dead copper, pour order 429): 78 vertices, not listed, extent 41.311,-2.4 216.211,91.894
P12V0 on L4 "NONET_L03_P-001" (solid, pour order 424): 42 vertices, not listed, extent 172,-2.638 216,25
GND_ISO4 on L4 "GND_ISO4" (solid, pour order 355): 33 vertices, not listed, extent -5,-1.8 137.8,22.729
GND_ISO3 on L4 "GND_ISO3" (solid, pour order 350): 31 vertices, not listed, extent -5,2.4 88.8,42.4
GND_ISO1 on L4 "GND_ISO1" (solid, pour order 251): 28 vertices, not listed, extent -5,66.333 111.8,90.8
GND_ISO2 on L4 "GND_ISO2" (solid, pour order 340): 29 vertices, not listed, extent -5.029,38.7 79,86.1
STRIP2 on L4 "NONET_L-01_P-001" (solid, remove dead copper, pour order 417): 97.143,-3.25 97.243,-3.35 97.243,-4.25 97.043,-4.45 41.943,-4.45 41.643,-4.15 41.643,-3.45 41.843,-3.25
STRIP3 on L4 "NONET_L-01_P-001" (solid, remove dead copper, pour order 408): 117.043,-3.45 117.043,-4.45 214.743,-4.45 215.743,-3.45
CHASSIS on L4 "NONET_L-01_P-001" (solid, remove dead copper, pour order 420): 36.843,-3.25 37.043,-3.45 37.043,-4.25 36.843,-4.45 -2.057,-4.45 -2.257,-4.25 -2.257,-3.55 -1.957,-3.25 36.643,-3.25
NetT_C11_1 on L4 "NETT_C11_1_L04_P380" (solid, remove dead copper, pour order 380): 196.143,83.2 194.343,85 188.1,85 185.5,82.4 185.5,65.6 187.697,63.397 188.943,62.15 204.243,62.15 204.943,62.85 204.943,72.55 203.643,73.85 197.743,73.85 196.143,75.45
P3V3 on L3 "P3V3" (solid, remove dead copper, pour order 413): 69 vertices, not listed, extent 41.35,-2.9 216.25,91.8
GND on L3 "GND" (solid, pour order 414): 30 vertices, not listed, extent 95.1,-0.2 216.5,90.5
P12V0 on L3 "P12V0" (solid, remove dead copper, pour order 401): 97 vertices, not listed, extent 85.3,-2.751 215.543,86.1
P3V3_MP on L3 "P3V3_MP" (solid, pour order 396): 78 vertices, not listed, extent 41.3,-2.822 194.152,44.2
P5V0_ISO4 on L3 "P5V0_ISO4" (solid, pour order 394): 33 vertices, not listed, extent -5,-1.8 137.8,22.729
P5V0_ISO1 on L3 "P5V0_ISO1" (solid, pour order 245): 28 vertices, not listed, extent -5,66.333 111.8,90.8
P5V0_ISO3 on L3 "P5V0_ISO3" (solid, pour order 359): 31 vertices, not listed, extent -5,2.4 88.8,42.4
P5V0_ISO2 on L3 "P5V0_ISO2" (solid, pour order 351): 29 vertices, not listed, extent -5.029,38.7 79,86.1
NetT_C11_2 on L3 "NETT_C11_2_L03_P395" (solid, remove dead copper, pour order 395): 196.143,83.4 194.943,84.6 189.2,84.6 186.5,81.9 186.5,74.6 195,66.1 195,63.7 196.5,62.2 196.7,62.15 204.243,62.15 204.943,62.85 204.943,72.55 203.643,73.85 197.743,73.85 196.143,75.45
GND on L2 "MidLayer1-GND" (solid, remove dead copper, pour order 431): 68 vertices, not listed, extent 41.3,-2.8 216.2,91.9
GND_ISO4 on L2 "GND_ISO4" (solid, pour order 425): 33 vertices, not listed, extent -5,-1.8 137.8,22.729
GND_ISO3 on L2 "GND_ISO3" (solid, pour order 422): 31 vertices, not listed, extent -5,2.4 88.8,42.4
GND_ISO1 on L2 "GND_ISO1" (solid, pour order 412): 28 vertices, not listed, extent -5,66.333 111.8,90.8
GND_ISO2 on L2 "GND_ISO2" (solid, pour order 416): 29 vertices, not listed, extent -5.029,38.7 79,86.1
GND on L5 "GND_L05_P430" (solid, remove dead copper, pour order 430): 70 vertices, not listed, extent 41.3,-3.25 216.539,91.5
GND_ISO4 on L5 "GND_ISO4" (solid, pour order 423): 33 vertices, not listed, extent -5,-1.8 137.8,22.729
GND_ISO3 on L5 "GND_ISO3" (solid, pour order 421): 31 vertices, not listed, extent -5,2.4 88.8,42.4
GND_ISO1 on L5 "GND_ISO1" (solid, pour order 371): 28 vertices, not listed, extent -5,66.333 111.8,90.8
GND_ISO2 on L5 "GND_ISO2" (solid, pour order 418): 29 vertices, not listed, extent -5.029,38.7 79,86.1

## Keep-outs
Keep-Out Layer:
  drawing of 8340 lines, arcs and shapes, not listed

## Other copper
TopLayer:
  rectangle net CHASSIS: 13.3,-3.5 16.7,1.2
  rectangle net GND: 202.915,42.7 216.5,46.203
L3:
  region net CHASSIS: 129.1,-1.5 125.9,-1.5 125.9,-4.8 129.1,-4.8
  rectangle net CHASSIS: 132.9,-4.8 136.1,-1.5
  rectangle net CHASSIS: 67.4,-4.8 69,-1.5
  region net CHASSIS: 63.6,-1.5 62,-1.5 62,-4.8 63.6,-4.8
  rectangle net CHASSIS: 132.9,90.8 134.5,93.6
  region net CHASSIS: 129.1,93.6 127.5,93.6 127.5,90.8 129.1,90.8
  region net CHASSIS: 63.6,93.6 62,93.6 62,90.8 63.6,90.8
  rectangle net CHASSIS: 67.4,90.8 69,93.6
  rectangle net CHASSIS: 16.9,90.8 18.5,93.6
  rectangle net CHASSIS: 185.9,-4.7 189.3,0
  rectangle net CHASSIS: 97.1,-4.7 100.5,0
  region net CHASSIS: 99.3,93.6 95.9,93.6 95.9,88.9 99.3,88.9
  region net CHASSIS: 13.1,93.6 11.5,93.6 11.5,90.8 13.1,90.8
Bottom Layer:
  rectangle net GND: 202.911,42.7 216.5,46.203

## Silkscreen, mask and mechanical layers (free items; w line width, h text height)
TopOverlay:
  drawing of 1238 lines, arcs and shapes, not listed
  text "<-On | Off->" at 72.2,91.6 h1
  text "5" at 115.7,90.9 h1 r90
  text "6" at 118.269,90.9 h1 r90
  text "7" at 120.869,90.9 h1 r90
  text "8" at 123.369,90.9 h1 r90
  text "Termination" at 82.55,90.421 h1
  text "GND" at 153.2,89.712 h1
  text "P12V0" at 138.4,89.7 h1
  text "P3V3" at 146.9,89.7 h1
  text "T0" at 82.7,88.7 h1
  text "<-On | Off->" at 37.823,88.093 h1
  text "Bank" at 112.5,88 h1 r90
  text "Termination" at 48.85,86.721 h1
  text "T1" at 82.7,86.1 h1
  text "T2" at 49,85 h1
  text "T3" at 49,82.4 h1
  text "GND_ISO_A" at 8.633,80.2 h1 r90
  text "<-In | Out->" at 126.3,80.2 h1 r90
  text "PGOOD" at 161.1,74.912 h1
  text "DIO_8SMA_8MCX v.P_version" at 164.1,65.3 h1.6
  text "GND_ISO_B" at 7.8,63.767 h1
  text "EEM 0" at 189.4,62.2 h1
  text "EEM 1" at 172.783,62.173 h1
  text "TS 2026" at 155.2,56.2 h1.02
  text "GND_ISO_C" at 7.7,41.767 h1
  text "GND_ISO_D" at 7.8,21.467 h1
  text "PSU_EN" at 157.6,15.177 h1
  text "P3V3_MP" at 172.7,10.777 h1
  text "Licensed under CERN-OHL-W v2 or later / https://ohwr.org/cernohl / https://github.com/sinara-hw/" at 31.1,7.8 h1.2
  text "T4" at 49,5.5 h1
  text "Termination" at 85.803,4.6 h1
  text "GND" at 173.6,3.312 h1
  text "T5" at 49,2.9 h1
  text "T6" at 85.9,2.4 h1
  text "<-On | Off->" at 38.3,0 h1
  text "T7" at 85.9,-0.2 h1
  text "Termination" at 38.915,-1.5 h1
  text "1" at 152.2,-1.767 h1 r90
  text "<-In | Out->" at 155,-1.8 h1 r90
  text "Bank" at 139.2,-2.1 h1
  text "4" at 144.6,-2.1 h1 r90
  text "3" at 147.1,-2.1 h1 r90
  text "2" at 149.7,-2.1 h1 r90
  text "<-On | Off->" at 74.7,-2.7 h1
BottomOverlay:
  drawing of 1234 lines, arcs and shapes, not listed
  text "DIO_8SMA_8MCX v.P_version" at 187.3,62.6 h1.6
  text "TS 2026" at 162.2,56.1 h1.02
TopSolder:
  rectangle: -2.309,-4.947 -0.132,-3.15
  rectangle: -0.132,-4.947 2.045,-3.175
  rectangle: 1.518,-4.947 216.487,-3.15
  region: 202.537,46.205 202.537,42.705 216.9,42.705 216.9,46.205
BottomSolder:
  rectangle: 1.437,-4.947 216.487,-3.15
  rectangle: -2.309,-4.947 -0.132,-3.15
  rectangle: -0.132,-4.947 2.045,-3.175
  region: 202.537,46.205 202.537,42.705 216.9,42.705 216.9,46.205
Mechanical 1:
  lines w0.1: -6,5.45 -6,83.45 -3.5,85.1 -3.5,94.45 214.9,94.45 216.9,92.45 216.9,-3.55 214.9,-5.55 -3.5,-5.55 -3.5,1.65 -3.5,3.8 -6,5.45
Mechanical 2:
  lines w0.1: -6.044,-19.788 -6.044,102.894
Mechanical 13:
  lines w0.01: -6.282,-6.334 -6.282,75.374
Mechanical 17:
  region: 216.9,42.7 202.9,42.7 202.9,46.2 216.9,46.2
  region: 216.9,42.7 202.9,42.7 202.9,46.2 216.9,46.2
  lines w0.013: -6,83.45 -6,5.45 -3.5,3.8 -3.5,-5.55 ; -3.5,85.1 -3.5,94.45 ; -3.5,-5.55 214.9,-5.55 ; -3.5,-5.55 -3.5,-3.05 216.9,-3.05 216.9,-3.55 ; -3.5,-5.55 214.9,-5.55 ; -3.5,94.45 214.9,94.45 -3.5,94.45 ; -3.5,94.45 -3.5,91.95 216.9,91.95 216.9,92.45 216.9,46.2 ; 214.9,-5.55 216.9,-3.55 ; 214.9,-5.55 216.9,-3.55 ; 216.9,-3.55 216.9,42.7 ; 216.9,42.7 216.9,46.2 ; 216.9,42.7 216.9,46.2 ; -6,3.9 1.9,3.9 cw(c1.9,0.8) 5,0.8 5,-5 94.5,-5 94.5,0 cw(c97.6,0) 100.7,0 100.7,-5 122,-5 122,93.9 100.7,93.9 100.7,88.9 cw(c97.6,88.9) 94.5,88.9 94.5,93.9 5,93.9 5,88.1 cw(c1.9,88.1) 1.9,85 -6,85 -6,3.9

## Text inside footprints (layer, text, board x,y; h text height)
SW1: TopOverlay "4" at 122.529,82.633 h1; TopOverlay "3" at 119.989,82.633 h1; TopOverlay "ON" at 114.401,87.078 h1; TopOverlay "2" at 117.449,82.633 h1; TopOverlay "1" at 115.163,82.633 h1; Mechanical 14 "4" at 122.529,82.633 h1; Mechanical 14 "3" at 119.989,82.633 h1; Mechanical 14 "ON" at 114.401,87.078 h1; Mechanical 14 "2" at 117.449,82.633 h1; Mechanical 14 "1" at 115.163,82.633 h1
SW2: TopOverlay "1" at 143.963,1.733 h1; TopOverlay "2" at 146.249,1.733 h1; TopOverlay "ON" at 143.201,6.178 h1; TopOverlay "3" at 148.789,1.733 h1; TopOverlay "4" at 151.329,1.733 h1; Mechanical 14 "1" at 143.963,1.733 h1; Mechanical 14 "2" at 146.249,1.733 h1; Mechanical 14 "ON" at 143.201,6.178 h1; Mechanical 14 "3" at 148.789,1.733 h1; Mechanical 14 "4" at 151.329,1.733 h1
SW5A: TopOverlay "ON" at 75.165,85.741 h1 r90; TopOverlay "2" at 79.61,88.789 h1 r90; TopOverlay "1" at 79.61,86.503 h1 r90; Mechanical 14 "ON" at 75.165,85.741 h1 r90; Mechanical 14 "2" at 79.61,88.789 h1 r90; Mechanical 14 "1" at 79.61,86.503 h1 r90
SW5B: TopOverlay "ON" at 41.422,82.041 h1 r90; TopOverlay "2" at 45.867,85.089 h1 r90; TopOverlay "1" at 45.867,82.803 h1 r90; Mechanical 14 "ON" at 41.422,82.041 h1 r90; Mechanical 14 "2" at 45.867,85.089 h1 r90; Mechanical 14 "1" at 45.867,82.803 h1 r90
SW5C: TopOverlay "1" at 45.867,3.303 h1 r90; TopOverlay "2" at 45.867,5.589 h1 r90; TopOverlay "ON" at 41.422,2.541 h1 r90; Mechanical 14 "1" at 45.867,3.303 h1 r90; Mechanical 14 "2" at 45.867,5.589 h1 r90; Mechanical 14 "ON" at 41.422,2.541 h1 r90
SW5D: TopOverlay "1" at 82.667,0.403 h1 r90; TopOverlay "2" at 82.667,2.689 h1 r90; TopOverlay "ON" at 78.222,-0.359 h1 r90; Mechanical 14 "1" at 82.667,0.403 h1 r90; Mechanical 14 "2" at 82.667,2.689 h1 r90; Mechanical 14 "ON" at 78.222,-0.359 h1 r90
T_J1: TopOverlay "30" at 192.667,21.555 h1.02 r270; Mechanical 14 "30" at 192.667,21.555 h1.02 r270
T_J2: TopOverlay "30" at 177.667,21.555 h1.02 r270; Mechanical 14 "30" at 177.667,21.555 h1.02 r270
T_J4: TopOverlay "6" at 194.85,8.6 h1 r90; TopOverlay "5" at 194.85,6.6 h1 r90; TopOverlay "4" at 194.85,4.6 h1 r90; TopOverlay "3" at 194.85,2.6 h1 r90; TopOverlay "2" at 194.85,0.6 h1 r90; TopOverlay "1" at 194.85,-1.4 h1 r90; TopOverlay "L" at 199.9,10.4 h1 r90; TopOverlay "K" at 201.3,10.4 h1 r90; TopOverlay "J" at 202.7,10.4 h1 r90; TopOverlay "I" at 204.1,10.4 h1 r90; TopOverlay "H" at 205.6,10.4 h1 r90; TopOverlay "G" at 207,10.4 h1 r90; TopOverlay "F" at 208.4,10.4 h1 r90; TopOverlay "E" at 209.8,10.4 h1 r90; TopOverlay "D" at 211.3,10.4 h1 r90; TopOverlay "C" at 212.7,11.3 h1 r90; TopOverlay "B" at 214.1,11.3 h1 r90; TopOverlay "A" at 215.543,11.29 h1 r90; Drill Drawing "Diam. 0.5mm +/-0.05" at 215.55,12.95 h1 r180; Drill Drawing "PRESS-FIT TECHNOLOGY" at 215.55,11.45 h1 r180; Mechanical 14 "6" at 194.85,8.6 h1 r90; Mechanical 14 "5" at 194.85,6.6 h1 r90; Mechanical 14 "4" at 194.85,4.6 h1 r90; Mechanical 14 "3" at 194.85,2.6 h1 r90; Mechanical 14 "2" at 194.85,0.6 h1 r90; Mechanical 14 "1" at 194.85,-1.4 h1 r90; Mechanical 14 "L" at 199.9,-3.25 h1 r90; Mechanical 14 "K" at 201.3,-3.25 h1 r90; Mechanical 14 "J" at 202.7,-3.25 h1 r90; Mechanical 14 "I" at 204.1,-3 h1 r90; Mechanical 14 "H" at 205.5,-3.25 h1 r90; Mechanical 14 "G" at 206.9,-3.25 h1 r90; Mechanical 14 "F" at 208.3,-3.25 h1 r90; Mechanical 14 "E" at 209.7,-3.25 h1 r90; Mechanical 14 "D" at 211.1,-3.25 h1 r90; Mechanical 14 "C" at 212.5,-4.25 h1 r90; Mechanical 14 "B" at 213.9,-4.25 h1 r90; Mechanical 14 "A" at 215.3,-4.25 h1 r90; Mechanical 8 "Edge of Daugher Card" at 217.65,0.725 h0.5 r90; Mechanical 8 "Top Surface of Mother Board" at 229.15,-0.425 h0.5 r90